# Altium PCB Membrane_Board_Latest.PcbDoc (part 4 of 4)
Units mil, origin at the board's own origin, x right, y up, seen from the top; angles counter-clockwise.
Board outline 11929.13 x 4962.8 mil, 2 copper layers (Top Layer, Bottom Layer), stack 59 mil thick; 247 components, 169 nets, 1256 pads, 657 vias.
Unrouted connection lines stored in the file: 293.
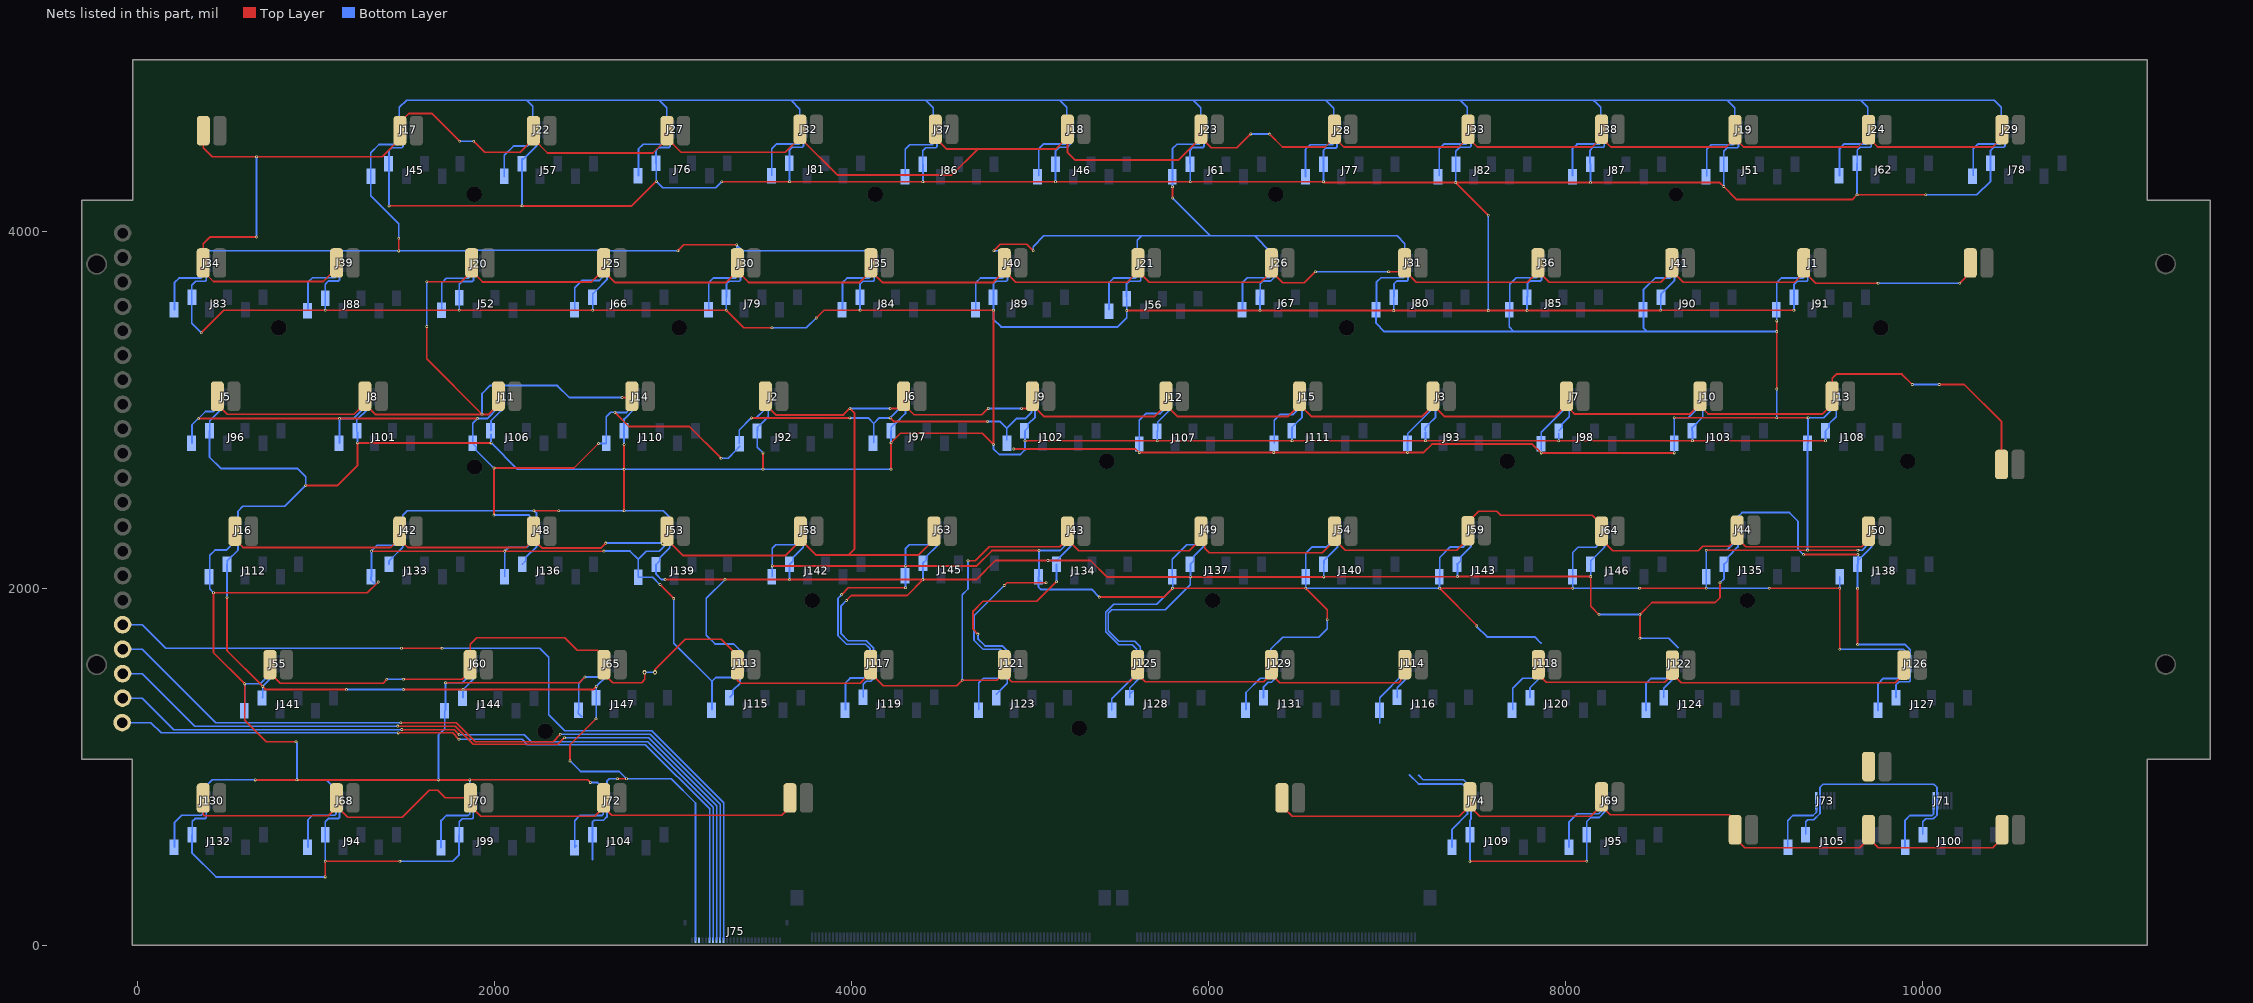
[diagram p4: the nets of this part, all layers, seen from the top]

## Via types
v1: diameter 15.75, hole 7.87, Top Layer to Bottom Layer, tented both sides, 655 vias
v2: diameter 23.62, hole 11.81, Top Layer to Bottom Layer, 2 vias

## Nets (pads, with @x,y where several pads share a name; then routed paths per layer and width w, separated by ;. In a path a pad name is that pad's centre, name@x,y a point inside that pad or via, vN(x,y) a via of type N, cw(c..) or ccw(c..) an arc to the next point about the centre after c; other vN are vias at no path point) (continued)
Row.ROW_1: J75.17 P17.1 SW1.1 SW2.1 SW3.1 SW4.1 SW5.1 SW6.1 SW7.1 SW8.1 SW41.1 SW42.1 SW43.1 SW44.1 SW45.1 SW46.1 SW47.1 SW48.1 | length 18103.5
  Top Layer w8: v1(1477.79,1663.46) v1(1705.79,1663.46)
  Top Layer w10: SW43.1@545,2320 545,2273.74 590.42,2228.32 1417.15,2228.32 1468.1,2279.28 SW44.1@1468.1,2320 ; SW44.1@1468.1,2273.74 1513.52,2228.32 2175.32,2228.32 SW45.1@2219.37,2272.37 ; SW45.1@2218,2320 2218,2273.74 SW45.1@2219.37,2272.37 ; SW45.1@2221,2274 SW45.1@2219.37,2272.37 ; v1(2621.97,2252.97) 2594,2225 2266.74,2225 SW45.1@2219.37,2272.37 ; v1(2942,2253) 2986.53,2253 3056.53,2183 3629,2183 3712.79,2266.79 SW47.1@3712.79,2273.74 ; SW1.1@3516.48,3076 3516.48,3029.74 3574.76,2971.46 3954.25,2971.46 v1(3990.79,3008) 4016,2982.79 4016,2219 3984,2187 ; SW47.1@3712.79,2320 SW47.1@3712.79,2273.74 ; v1(4216,3008) 4261.59,3008 SW2.1@4292,3038.41 ; SW2.1@4292,3076 SW2.1@4292,3038.41 ; SW48.1@4461.79,2320 4461.79,2272.79 4376,2187 3984,2187 ; v1@4766,3009 4729,2972 4349.74,2972 4292,3029.74 SW2.1@4292,3038.41 ; v1(4952,3008) 4982.07,3008 SW3.1@5012.48,3038.41 ; SW3.1@5012.48,3076 SW3.1@5012.48,3038.41 ; SW4.1@5760.79,3076 SW4.1@5760.79,3029.74 ; SW5.1@6509.1,3026.41 6444.69,2962 5828.53,2962 SW4.1@5760.79,3029.74 ; SW5.1@6509.79,3029.74 6577.53,2962 7193.69,2962 SW6.1@7258.1,3026.41 ; SW6.1@7256.79,3029.74 7324.53,2962 7940.69,2962 SW7.1@8005.1,3026.41 ; SW7.1@8005.79,3076 8005.79,3022.21 8006.17,3022.21 8033.72,2994.67 8033.72,2994.28 8052,2976 8695.9,2976 SW8.1@8747.82,3027.92 ; SW8.1@8731,3044.74 SW8.1@8747.82,3027.92 ; SW8.1@8760.31,3040.41 SW8.1@8747.82,3027.92 ; v1(9943,3142) 9885,3200 9518,3200 9494.48,3176.48 SW41.1@9494.48,3076 9494.48,3030.48 9441,2977 8798.74,2977 SW8.1@8747.82,3027.92 ; v1(10094.37,3142) 10234,3142 10443.48,2932.52 SW42.1@10443.48,2694 ; SW47.1@3712.79,2273.74 3799.53,2187 3984,2187 ; SW3.1@5012.48,3038.41 5012.48,3029.74 5080.22,2962 5696.38,2962 5760.79,3026.41 SW4.1@5760.79,3029.74
  Bottom Layer w8: P17.1@-84.75,1796.06 25.25,1796.06 157.85,1663.46 v1(1477.79,1663.46) ; v1(1705.79,1663.46) 2251.54,1663.46 2301.79,1613.21 2301.79,1292.46 2393.79,1200.46 2880.14,1200.46 3283.05,797.55 J75.17@3283.05,28.46
  Bottom Layer w10: v1(2621.97,2252.97) v1(2942,2253) ; v1(3990.79,3008) v1(4216,3008) ; v1(4766,3008) v1(4952,3008) ; v1(9943,3142) v1(10094.37,3142)
Row.ROW_2: J75.18 P18.1 SW9.1 SW10.1 SW11.1 SW12.1 SW13.1 SW14.1 SW15.1 SW16.1 SW49.1 SW50.1 SW51.1 SW52.1 SW53.1 SW54.1 SW55.1 SW56.1 | length 17595.9
  Top Layer w8: v1(1473.79,1246.46) 1785.54,1246.46 1891,1141 2327,1141 v1(2367.75,1181.75)
  Top Layer w10: SW53.1@447.31,3028.74 501.06,2975 1212,2975 1246.68,3009.68 SW54.1@1265.68,3009.68 ; SW54.1@1274.95,3030.99 1331.94,2974 1966.44,2974 SW55.1@2023.43,3030.99 ; v1(1619,3467) 1619,3285 v1(1929,2975) ; v1(1619,3717) 1811.74,3717 SW9.1@1871.48,3776.74 ; SW9.1@1871.48,3823 SW9.1@1871.48,3776.74 ; SW10.1@2611,3823 SW10.1@2611,3783.89 ; v1(2714,3069) 2761.48,3069 SW56.1@2768.48,3076 ; SW11.1@3359.48,3823 3359.48,3776.74 3296.74,3714 2673.74,3714 2611,3776.74 SW10.1@2611,3783.89 ; SW11.1@3359.69,3776.74 3422.43,3714 4045.43,3714 SW12.1@4108.17,3776.74 ; SW12.1@4108.69,3776.74 4171.43,3714 4794.43,3714 SW13.1@4857.17,3776.74 ; SW13.1@4857.43,3777.99 4920.17,3715.25 5543.17,3715.25 SW14.1@5605.91,3777.99 ; SW14.1@5605.95,3777.99 5668.69,3715.25 6291.69,3715.25 SW15.1@6352.59,3776.15 ; SW15.1@6352,3823 6352,3776.74 SW15.1@6352.59,3776.15 ; SW15.1@6354.43,3777.99 SW15.1@6352.59,3776.15 ; v1(6599,3774) 6537,3712 6416.74,3712 SW15.1@6352.59,3776.15 ; v1(7009,3774) 7068.07,3774 7098.48,3804.41 SW16.1@7098.48,3823 ; SW16.1@7100.43,3777.99 7163.17,3715.25 7786.17,3715.25 SW49.1@7848.17,3777.25 ; SW49.1@7847.43,3777.99 SW49.1@7848.17,3777.25 ; SW49.1@7848.91,3777.99 SW49.1@7848.17,3777.25 ; SW50.1@8595.91,3777.99 8533.17,3715.25 7910.17,3715.25 SW49.1@7848.17,3777.25 ; SW50.1@8597.43,3777.99 8660.17,3715.25 9283.17,3715.25 SW51.1@9339.83,3771.91 ; SW51.1@9335,3823 9335,3776.74 SW51.1@9339.83,3771.91 ; v1(9752,3709) 9402.74,3709 SW51.1@9339.83,3771.91 ; v1(10209,3709) 10240.92,3740.92 10240.92,3742.03 10268.48,3769.59 SW52.1@10268.48,3823 ; SW9.1@1871.48,3776.74 1932.22,3716 2542,3716 2575.18,3749.18 2576.29,3749.18 SW10.1@2611,3783.89
  Bottom Layer w8: P18.1@-84.75,1658.91 25.25,1658.91 437.7,1246.46 v1(1473.79,1246.46) v1@1474.11,1246.46 ; v1(2367.75,1181.75) 2871.02,1181.75 3263.36,789.4 J75.18@3263.36,28.46
  Bottom Layer w10: v1(1619,3467) v1(1619,3717) ; v1(1929,2975) 1929,3091 1973.46,3135.46 2351.54,3135.46 2418,3069 v1(2714,3069) ; v1(6599,3774) v1(7009,3774) ; v1(9752,3709) v1(10209,3709)
Row.ROW_3: J75.19 P19.1 SW17.1 SW18.1 SW19.1 SW20.1 SW21.1 SW22.1 SW23.1 SW24.1 SW57.1 SW58.1 SW59.1 SW60.1 SW61.1 SW62.1 SW63.1 SW64.1 | length 18513.9
  Top Layer w8: SW24.1@741,1572 741,1525.74 797.74,1469 1374.79,1469 v1(1395.79,1490) ; v1(1456.79,1227.46) 1779.92,1227.46 1881.38,1126 2353.92,1126 v1(2390.79,1162.87) ; v1@1489,1490 1819.6,1490 1863,1533.4 SW57.1@1863,1572 1863,1685 1901,1723 2394,1723 2463,1654 2574.71,1654 2611.48,1617.23 SW58.1@2611.48,1572 2611.48,1521.64 2661.12,1472 2823,1472 2840,1489 v2(2840,1529) ; v2(2898,1529) 2898,1544 3068,1714 3269,1714 3359.48,1623.52 SW59.1@3359.48,1572 3360,1571.48 3360,1486 3378,1468 4048,1468 SW60.1@4107,1527 ; SW60.1@4107,1572 SW60.1@4107,1527 ; v1(4652.05,2154.46) 4692.46,2154.46 4770,2232 5166.65,2232 5208.39,2273.74 SW17.1@5209.42,2273.74 ; SW61.1@4834,1502 4831.74,1502 4814.2,1484.46 v1(4620.05,1484.46) 4588.59,1453 4177,1453 4107,1523 SW60.1@4107,1527 ; SW61.1@4855.48,1572 4855.48,1518.52 4897,1477 5559,1477 SW62.1@5603,1521 ; SW17.1@5209.42,2320 SW17.1@5209.42,2273.74 ; SW62.1@5603,1572 SW62.1@5603,1521 ; SW63.1@6351.48,1572 SW63.1@6351.48,1519.52 ; SW19.1@6706,2320 SW19.1@6706,2273.74 ; SW64.1@7099.48,1572 7075.83,1548.35 7075.83,1480.83 7067,1472 6399,1472 SW63.1@6351.48,1519.52 ; SW22.1@8962.48,2326 SW22.1@8962.48,2279.74 ; SW23.1@9698.48,2320 9698.48,2271.48 9659.33,2232.33 9009.89,2232.33 SW22.1@8962.48,2279.74 ; SW17.1@5209.42,2273.74 5274.16,2209 5892,2209 5958,2275 SW18.1@5958,2320 5978.68,2299.32 5978.68,2225.32 6003.87,2200.13 6637.13,2200.13 6706,2269 SW19.1@6706,2273.74 ; SW62.1@5603,1521 5603,1518.05 5644.05,1477 6310.43,1477 6351.48,1518.05 SW63.1@6351.48,1519.52 ; SW19.1@6706,2273.74 6765.74,2214 7391,2214 7453.48,2276.48 SW20.1@7453.48,2323 7453.48,2369.26 7515.22,2431 7616,2431 7638,2409 8150.71,2409 8202.05,2357.66 SW21.1@8202.05,2320 8202.05,2273.74 8264.79,2211 8745,2211 8770,2236 8918.74,2236 SW22.1@8962.48,2279.74
  Bottom Layer w8: P19.1@-84.75,1521.76 25.25,1521.76 319.55,1227.46 v1(1456.79,1227.46) ; v1@1396,1490 v1(1488.79,1490) ; v1(2390.79,1162.87) 2862.05,1162.87 3243.68,781.25 J75.19@3243.68,28.46 ; v2(2840,1529) v2(2898,1529) ; v1@4619,1484 4620,1485 4620,1811
  Bottom Layer w10: 4620,1811 4620,1964 4652.05,1996.05 v1(4652.05,2154.46)
Row.ROW_4: J75.20 P20.1 SW25.1 SW26.1 SW27.1 SW28.1 SW29.1 SW30.1 SW31.1 SW32.1 SW65.1 SW66.1 SW67.1 SW68.1 SW69.1 SW70.1 SW71.1 | length 14941.7
  Top Layer w8: SW28.1@367,825 367,733 374,726 1068.43,726 1113.48,771.05 SW29.1@1113.48,778.74 ; SW29.1@1113.48,825 SW29.1@1113.48,778.74 ; v1(1479.79,1208.46) 1772.23,1208.46 v1(1800.85,1179.85) ; SW30.1@1863,872 SW30.1@1863.48,871.52 ; SW31.1@2610.48,825 SW31.1@2610.48,773.52 ; SW32.1@3654.48,825 3654.48,773.48 3609,728 2656,728 SW31.1@2610.48,773.52 ; SW65.1@6411.48,825 6411.48,774.48 6411,774 6416.22,774 6468.22,722 7404,722 SW66.1@7464,782 ; SW66.1@7464,831 SW66.1@7464,782 ; SW25.1@7847.48,1571 7847.48,1517.52 7892,1473 8554.97,1473 SW26.1@8598,1516.03 ; SW67.1@8202,831 SW67.1@8202,784 ; SW26.1@8598.48,1520.52 8649,1470 9848,1470 9896,1518 SW27.1@9896,1570 ; SW70.1@9698,647 SW70.1@9698,600.74 ; SW71.1@10446,647 10446,597 10394,545 9753.74,545 SW70.1@9698,600.74 ; SW29.1@1113.48,778.74 1176.22,716 1483,716 1634,867 1681,867 1723,825 SW30.1@1863.48,825 1863.48,780.48 1863,780 1921,722 2561,722 2610.48,771.48 SW31.1@2610.48,773.52 ; SW66.1@7464,782 7464,779 7519,724 8142,724 SW67.1@8202,784 ; SW67.1@8202,784 8202,780 8252,730 8919,730 8950,699 SW68.1@8950,647 8950,602 8948,600 8950.74,600 9005.74,545 9649.95,545 9698,593.05 SW70.1@9698,600.74
  Bottom Layer w8: P20.1@-84.75,1384.61 25.25,1384.61 201.4,1208.46 v1(1479.79,1208.46) ; v1(1800.85,1179.85) 1801.69,1179 2167,1179 2206,1140 2857.09,1140 3223.99,773.09 J75.20@3223.99,28.46
Row.ROW_5: J75.21 P21.1 SW33.1 SW34.1 SW35.1 SW36.1 SW37.1 SW38.1 SW39.1 SW40.1 SW73.1 SW74.1 SW75.1 SW76.1 SW77.1 SW78.1 SW79.1 SW80.1 | length 17969.6
  Top Layer w8: v1(1459.79,1189.46) 1764.54,1189.46 v1(1800,1154)
  Top Layer w10: SW33.1@367.48,4564 367.48,4467.52 417,4418 v1(666,4418) 1369.74,4418 1469.48,4517.74 SW34.1@1469.48,4564 1469.48,4610.26 1520.22,4661 1648,4661 v1(1804,4505) ; v1(666,3968) 404,3968 367,3931 SW79.1@367,3823 367,3776.74 424.74,3719 1039.54,3719 1114.48,3793.94 SW80.1@1114.48,3823 ; v1(1882.5,4505) 1944.5,4443 2142.74,4443 SW35.1@2217.48,4517.74 ; SW35.1@2217.48,4564 SW35.1@2217.48,4517.74 ; SW36.1@2966,4564 SW36.1@2966,4521 ; SW37.1@3710.79,4571.75 SW37.1@3710.79,4525.49 ; SW38.1@4469,4571.75 4469,4525.49 4533.49,4461 4706,4461 ; SW40.1@5957,4571.75 SW40.1@5957,4525.49 ; v1(6237,4546) 6159,4468 6014.49,4468 SW40.1@5957,4525.49 ; v1(6342,4545) 6414.25,4472.75 6652.74,4472.75 SW73.1@6705.48,4525.49 ; SW73.1@6705.48,4571.75 SW73.1@6705.48,4525.49 ; SW74.1@7454,4571.75 SW74.1@7454,4525.49 ; SW75.1@8202.48,4571.75 SW75.1@8202.48,4525.49 ; SW76.1@8950.48,4569.75 8950.48,4523.49 SW76.1@8948.91,4521.92 ; SW77.1@9694.1,4527.84 9639.01,4472.75 8998.07,4472.75 SW76.1@8948.91,4521.92 ; SW77.1@9698,4569.75 9698,4523.49 9748.74,4472.75 10393.1,4472.75 SW78.1@10446.48,4526.13 ; SW35.1@2217.48,4517.74 2296.22,4439 2887.26,4439 2961.26,4513 2966,4513 SW36.1@2966,4521 ; SW36.1@2966,4521 3044,4443 3628.3,4443 SW37.1@3710.79,4525.49 ; SW37.1@3710.79,4525.49 3921.28,4315 4560,4315 4706,4461 ; 4706,4461 5144.51,4461 5184.51,4501 5209,4501 5209,4444 5254,4399 5830.51,4399 SW40.1@5957,4525.49 ; SW73.1@6705.48,4525.49 6758.22,4472.75 7401.26,4472.75 SW74.1@7454,4525.49 ; SW74.1@7454,4525.49 7506.74,4472.75 8149.74,4472.75 SW75.1@8202.48,4525.49 ; SW75.1@8202.48,4525.49 8202.48,4523.66 8253.39,4472.75 8899.74,4472.75 SW76.1@8948.91,4521.92
  Top Layer w12: SW78.1@10446.48,4526.13 SW78.1@10446.48,4569.75
  Bottom Layer w8: P21.1@-87.27,1247.46 73.54,1247.46 131.25,1189.75 821.21,1189.75 821.5,1189.46 v1(1459.79,1189.46) ; v1(1800,1154) 2154,1154 2184,1124 2843.81,1124 3204.31,763.5 J75.21@3204.31,28.46
  Bottom Layer w10: v1(666,3968) v1(666,4418) ; v1(1804,4505) v1(1882.5,4505) ; v1(6237,4546) 6237.5,4545.5 6341.5,4545.5 v1(6342,4545)
VCC_3V3: J1.2 J2.2 J3.2 J5.2 J6.2 J7.2 J8.2 J9.2 J10.2 J11.2 J12.2 J13.2 J14.2 J15.2 J16.2 J17.2 J18.2 J19.2 J20.2 J21.2 J22.2 J23.2 J24.2 J25.2 J26.2 J27.2 J28.2 J29.2 J30.2 J31.2 J32.2 J33.2 J34.2 J35.2 J36.2 J37.2 J38.2 J39.2 J40.2 J41.2 J42.2 J43.2 J44.2 J45.2 J46.2 J48.2 J49.2 J50.2 J51.2 J52.2 J53.2 J54.2 J55.2 J56.2 J57.2 J58.2 J59.2 J60.2 J61.2 J62.2 J63.2 J64.2 J65.2 J66.2 J67.2 J68.2 J69.2 J70.2 J71.2 J72.2 J73.2 J74.2 J75.25 J76.2 J77.2 J78.2 J79.2 J80.2 J81.2 J82.2 J83.2 J84.2 J85.2 J86.2 J87.2 J88.2 J89.2 J90.2 J91.2 J92.2 J93.2 J94.2 J95.2 J96.2 J97.2 J98.2 J99.2 J100.2 J101.2 J102.2 J103.2 J104.2 J105.2 J106.2 J107.2 J108.2 J109.2 J110.2 J111.2 J112.2 J113.2 J114.2 J115.2 J116.2 J117.2 J118.2 J119.2 J120.2 J121.2 J122.2 J123.2 J124.2 J125.2 J126.2 J127.2 J128.2 J129.2 J130.2 J131.2 J132.2 J133.2 J134.2 J135.2 J136.2 J137.2 J138.2 J139.2 J140.2 J141.2 J142.2 J143.2 J144.2 J145.2 J146.2 J147.2 | length 74949.2
  Top Layer w10: v1(355.79,3431.46) 482.16,3557.83 v1(1050.84,3557.83) v1(1801.84,3557.83) v1(2550.1,3557.83) v1(3298.1,3557.83) 3396.47,3459.46 v1(3553.79,3459.46) ; v1(500.42,1948.83) 500.42,1649.81 v1@699.77,1450.46 ; v1(700.16,1450.07) 717.77,1432.46 1168.46,1432.46 v1@1169,1433 ; v1(940.79,2576.58) 1119.92,2576.58 1231.79,2688.46 v1(1231.79,2814.46) v1(1980.16,2814.46) ; v1(1050.96,383) v1(1050.96,470) v1(1468.96,470) ; v1(1407.79,4142.46) 1408.5,4143.17 2153.08,4143.17 v1(2153.79,4143.87) ; v1(1488.79,1432.46) 2551.73,1432.46 v1(2569.73,1450.46) ; v1@2153.79,4142.46 2768.46,4142.46 v1(2906,4280) ; v1(2219.79,2434.46) v1(2358.81,2434.46) ; v1(2422,1033) 2422,1122.78 v1(2567.79,1268.57) ; v1@2689.79,932.46 v1(2738.79,932.46) ; v1(2725.1,2434.46) v1(2725.1,2805.46) ; v1(2954.79,2048.54) v1(3290.79,2048.54) v1(3652.79,2048.54) v1(4399.79,2048.54) ; v1@3273.23,4278 v1(3652.48,4278) v1(4399.68,4278) v1(5142.36,4278) ; v1(3503.79,2666.87) v1(3503.79,2758.46) ; v1(3801.79,3514.46) 3845.16,3557.83 v1(4047.79,3557.83) v1(4794.79,3557.83) v1(4794.79,2806.46) 4732.79,2868.46 4274.16,2868.46 4220.97,2815.27 4220.97,2667.06 v1(4220.79,2666.87) ; v1(3970.79,1931.46) 3998.79,1959.46 4310.71,1959.46 v1(4399.79,2048.54) ; v1(4708,1743) 4681,1770 4681,1872 4736.46,1927.46 5037.79,1927.46 v1(5147.42,2037.09) ; v1(4971.79,2826.46) v1(5713.16,2826.46) v1(6468.16,2826.46) v1(7216.16,2826.46) v1(7961.79,2826.46) v1(8711.16,2826.46) v1(9456.79,2826.46) ; 5150.36,4278 v1(5897.05,4278) v1(6643.73,4278) ; v1(5541.84,3555.69) v1(6288.16,3555.69) v1@7037.42,3555.69 ; v1@6643.73,4273 v1@7385.42,4273 ; v1@6645.42,2063.83 5430.42,2063.83 5338.79,2155.46 v1(5099.79,2155.46) 4805.46,2155.46 4698.54,2048.54 v1(4399.79,2048.54) ; v1(6645.79,2063.46) 6646.82,2064.49 7393.65,2064.49 v1(7394.68,2065.51) v1@8141.68,2065.51 ; v1(7037.84,3555.69) v1(7567.79,3555.69) v1(7785.16,3555.69) v1@8533.16,3555.69 ; v1@7464.47,470.13 v1@8119.42,470.13 ; v1@7567.79,4090.63 v1(7385.42,4273) ; v1(8142.05,2065.14) 8142.05,1898.2 v1(8187.79,1852.46) ; v1@8416.79,1720.46 v1@8416.79,1846.46 ; v1(8416.79,1852.46) 8484.79,1920.46 8838.79,1920.46 8865.79,1947.46 v1(8865.79,2030.46) ; v1(8534.16,3557.48) v1(9279.79,3557.46) ; v1(9333.79,2188.75) v1(9638.42,2188.75) ; v1(9636.79,1684.46) v1(9636.79,2000.46) ; v1@10017,4204.58 v1(9633.47,4204.58) 9606.89,4178 8959.8,4178 v1(8886.79,4251.01) 8864.8,4273 v1(8140.1,4273) v1(7385.42,4273)
  Bottom Layer w8: 5618.42,1655 5618.42,1672.58 5586.54,1704.46 5497.79,1704.46 5439,1763.25 5439,1858.79 5458.67,1878.46 5757.79,1878.46 5898.42,2019.09 v1(5898.42,2063.83)
  Bottom Layer w10: J132.2@303.79,619.25 303.79,518 438.79,383 v1(1050.96,383) ; J132.2@305.42,620.88 305.42,693.75 321.42,709.75 378.25,709.75 384.1,715.61 J130.2@384.1,810.75 ; v1(355.79,3431.46) 303.1,3484.14 J83.2@303.1,3630.25 303.1,3698.77 325.08,3720.75 377.56,3720.75 383.42,3726.61 J34.2@383.42,3821.75 ; J96.2@401.73,2882.25 401.73,2735.51 465.79,2671.46 894.79,2671.46 940.95,2625.3 v1@940.95,2576.42 ; J96.2@403.36,2883.88 403.36,2939.36 465.05,3001.05 J5.2@465.05,3073.75 ; v1(500.42,1948.83) J112.2@500.42,2134.25 ; J112.2@502.05,2135.88 502.05,2154.18 561.73,2213.87 J16.2@561.73,2325.75 561.73,2431.73 589.46,2459.46 823.66,2459.46 v1(940.79,2576.58) ; J141.2@698.73,1386.88 700.16,1388.31 v1(700.16,1450.07) 757,1506.9 J55.2@757,1577.86 ; v1@1049.96,470 1050.73,470.77 J94.2@1050.73,619.25 1050.73,692.12 1068.36,709.75 1125.19,709.75 1131.05,715.61 J68.2@1131.05,810.75 ; v1@1050.79,3557.88 J88.2@1050.79,3625.62 1050.79,3704.18 1068.36,3721.75 1125.19,3721.75 1131.05,3727.61 J39.2@1131.05,3822.75 ; v1@1170.27,1432.46 v1@1488.62,1432.46 ; J101.2@1227.79,2882.25 1227.79,2943.79 1288.1,3004.1 J8.2@1288.1,3073.75 ; J101.2@1228.79,2877.46 1231.79,2874.46 v1(1231.79,2814.46) ; v1(1407.79,4142.46) 1407.79,4452.75 1423.79,4468.75 1480.62,4468.75 1486.47,4474.61 J17.2@1486.47,4569.75 ; J133.2@1408.73,2135.88 1408.73,2154.18 1427.1,2172.55 1427.55,2172.55 1485.42,2230.42 1485.42,2410.09 1509.79,2434.46 v1(2219.79,2434.46) 2234.73,2419.51 J48.2@2234.73,2325.75 2234.73,2233.73 2174.42,2173.42 2174.42,2154.25 J136.2@2156.05,2135.88 ; v1(1468.96,470) 1766,470 1799.79,503.79 J99.2@1799.79,618.25 ; J99.2@1801.42,619.88 1801.42,692.75 1817.42,708.75 1874.25,708.75 1880.1,714.61 J70.2@1880.1,809.75 ; v1(1801.84,3557.83) J52.2@1801.84,3628.56 ; J52.2@1802.05,3629.88 1802.05,3702.75 1818.05,3718.75 1874.88,3718.75 1880.73,3724.61 J20.2@1880.73,3819.75 ; J144.2@1822.42,1386.88 1822.42,1432.46 1879.1,1489.14 J60.2@1879.1,1576.75 ; J106.2@1979.05,2883.88 1979.05,2937.05 2035.73,2993.73 J11.2@2035.73,3073.75 ; J106.2@1980.1,2862.19 1980.1,2814.46 2127.69,2666.87 v1@2724.69,2666.87 ; v1(2153.79,4143.87) 2153.79,4405.94 2163.13,4405.94 2234.05,4476.87 J22.2@2234.05,4569.75 ; v1(2358.81,2434.46) 2945.54,2434.46 2981.1,2398.9 2981.1,2228.1 2924.79,2171.79 2924.79,2153.25 J139.2@2904.79,2133.25 2904.79,2078.46 2934.71,2048.54 v1(2954.79,2048.54) ; v1(2422,1033) 2481.54,973.46 2697.79,973.46 v1(2738.79,932.46) 2989.75,932.46 3125.57,796.64 J75.25@3125.57,28.46 ; 2548.42,479.46 J104.2@2548.42,618.25 2548.42,691.12 2557.3,700 2610,700 2628.73,718.73 J72.2@2628.73,809.75 2628.73,918.4 2642.79,932.46 v1(2687.79,932.46) ; v1(2550.1,3557.83) 2550.05,3650.18 2568.42,3668.55 2568.55,3668.55 2628.73,3728.73 J25.2@2628.73,3821.75 ; v1(2567.79,1268.57) 2568.73,1269.51 J147.2@2568.73,1386.25 2569.73,1387.25 v1(2569.73,1450.46) 2627.05,1507.77 J65.2@2627.05,1577.75 ; v1(2725.1,2805.46) J110.2@2725.1,2882.25 2725.1,2947.97 2786.42,3009.29 J14.2@2786.42,3073.75 ; v1@2725.52,2666.87 v1@3507.79,2666.87 ; J76.2@2903.16,4382.32 2906,4379.48 v1(2906,4280) 2941.35,4244.65 3238.63,4244.65 v1(3271.98,4278) ; J76.2@2904.79,4380.88 2904.79,4453.75 2920.79,4469.75 2977.62,4469.75 2983.47,4475.61 J27.2@2983.47,4570.75 ; v1(3290.79,2048.54) 3186,1943.75 3186,1737 3235,1688 3339,1688 3375.42,1651.58 J113.2@3375.42,1578.75 3375.42,1468.42 3335.1,1428.1 3335.1,1407.25 J115.2@3316.73,1388.88 ; v1(3298.1,3557.83) J79.2@3298.1,3634.32 ; J79.2@3298.73,3631.88 3298.73,3704.75 3314.73,3720.75 3371.56,3720.75 3377.42,3726.61 J30.2@3377.42,3821.75 ; J92.2@3471.1,2881.25 3471.1,2791.14 v1(3503.79,2758.46) ; J92.2@3472.73,2882.88 3472.73,2901.18 3491.1,2919.55 3533,2961.45 J2.2@3533,3070.23 ; v1@3508.2,2666.87 v1(4220.79,2666.87) ; v1(3553.79,3459.46) 3746.79,3459.46 v1(3801.79,3514.46) ; J81.2@3650.73,4382.32 3652.48,4380.58 v1(3652.48,4278) ; J81.2@3651.79,4381.88 3651.79,4454.75 3667.79,4470.75 3724.62,4470.75 3730.47,4476.61 J32.2@3730.47,4571.75 ; v1(3652.79,2048.54) J142.2@3652.79,2134.25 3672.79,2154.25 3672.79,2174.29 3723.25,2224.75 3729.1,2230.61 J58.2@3729.1,2325.75 ; v1(3970.79,1931.46) 3941,1901.67 3941,1745.25 3979.79,1706.46 4082,1706.46 4123.42,1665.04 J117.2@4123.42,1579.75 J117.2@4123.42,1570.58 ; v1@4047.73,3557.83 4047.73,3704.75 4063.73,3720.75 4120.56,3720.75 4126.42,3726.61 J35.2@4126.42,3821.75 ; J119.2@4064.73,1389.88 4064.73,1462.75 4080.98,1479 4107,1479 4123.42,1495.42 J117.2@4123.42,1570.58 ; J117.2@4124,1570 J117.2@4123.42,1570.58 ; v1@4221.1,2813.46 J97.2@4221.1,2881.19 ; J97.2@4222.73,2884.88 4222.73,2903.18 4241.1,2921.55 4243.55,2921.55 4301.42,2979.42 J6.2@4301.42,3074.75 ; J86.2@4398.79,4376.62 4398.79,4450.75 4415.79,4467.75 4472.62,4467.75 4478.47,4473.61 J37.2@4478.47,4568.75 ; v1(4399.68,4278) J86.2@4399.68,4376.61 ; v1(4399.79,2048.54) J145.2@4399.79,2140.32 4419.79,2160.32 4419.79,2178.79 4480.42,2239.42 J63.2@4480.42,2326.75 ; v1(4708,1743) 4708,1716.25 4747.79,1676.46 4828,1676.46 ; v1(4794.79,2806.46) 4794.79,2781.46 4826.79,2749.46 4945.79,2749.46 4971.79,2775.46 4971.79,2806.46 ; J89.2@4794.79,3634.32 v1(4794.79,3557.83) 4794.79,3507.46 4837.79,3464.46 5490.79,3464.46 5541.84,3515.51 v1(5541.84,3555.69) ; J89.2@4795.1,3631.88 4795.1,3704.75 4811.1,3720.75 4867.93,3720.75 4873.79,3726.61 J40.2@4873.79,3821.75 ; J123.2@4812.05,1407.05 4812.05,1407.18 4830.42,1425.55 4830.55,1425.55 4871.73,1466.73 J121.2@4871.73,1578.75 4871.73,1650.27 4846,1676 4828,1676 ; 4971.42,2806.46 4971.79,2806.83 4971.79,2881.88 4971.42,2882.25 4989.79,2900.62 4989.79,2920.79 5028.1,2959.1 J9.2@5028.1,3073.75 ; v1(5099.79,2155.46) 5150.32,2155.46 5167.42,2172.55 5167.42,2174.83 5227.73,2235.14 J43.2@5227.73,2325.75 ; J46.2@5141.79,4376.62 5141.79,4448.81 5163.73,4470.75 5207.75,4470.75 5226.42,4489.42 J18.2@5226.42,4571.75 ; v1(5142.36,4278) J46.2@5142.36,4376.04 ; v1(5147.42,2037.09) J134.2@5147.42,2134.25 ; J56.2@5541.05,3631.88 5541.05,3704.75 5557.05,3720.75 5613.88,3720.75 5619.73,3726.61 J21.2@5619.73,3821.75 ; v1@5541.79,3555.75 J56.2@5541.79,3623.32 ; J128.2@5558.1,1387.25 5558.1,1441.1 5618.42,1501.42 J125.2@5618.42,1554.42 ; J128.2@5559.73,1406.73 5559.73,1407.18 J128.2@5578.1,1425.55 ; J125.2@5618.42,1578.75 5618.42,1655 ; J107.2@5711.79,2879.25 5713.16,2877.88 v1(5713.16,2826.46) ; J107.2@5713.42,2880.88 5715.7,2883.15 5715.7,2931.7 5777.1,2993.1 J12.2@5777.1,3070.75 ; J61.2@5896.42,4380.88 5896.42,4453.75 5912.42,4469.75 5969.25,4469.75 5975.1,4475.61 J23.2@5975.1,4570.75 ; v1(5897.05,4278) J61.2@5897.05,4376.61 ; v1(5898.42,2063.83) 5898.42,2135.25 5916.79,2153.62 5916.79,2178.57 5974.1,2235.88 J49.2@5974.1,2326.75 ; v1@6288.1,3555.69 J67.2@6288.1,3631.4 ; J67.2@6289.73,3632.88 6289.73,3705.75 6305.73,3721.75 6348.75,3721.75 6368.42,3741.42 J26.2@6368.42,3822.75 ; J131.2@6307.42,1387.25 6307.42,1446.42 6334,1473 6353,1473 6368.73,1488.73 J129.2@6368.73,1578.75 ; J111.2@6466.1,2882.25 6468.16,2880.19 v1(6468.16,2826.46) ; J111.2@6467.73,2883.88 6467.73,2902.18 6486.1,2920.55 6486.55,2920.55 6524.42,2958.42 J15.2@6524.42,3073.75 ; v1(6643.73,4278) J77.2@6643.73,4376.62 ; J77.2@6643.79,4376.62 6643.79,4452.75 6657.79,4466.75 6714.62,4466.75 6720.47,4472.61 J28.2@6720.47,4567.75 ; v1(6645.79,2063.46) J140.2@6645.79,2134.19 ; J140.2@6646.36,2136.88 6646.36,2155.18 6722.05,2230.87 J54.2@6722.05,2326.75 ; v1@7037.79,3555.69 J80.2@7037.79,3631.4 ; J80.2@7039.42,3632.88 7039.42,3705.75 7055.42,3721.75 7112.25,3721.75 7118.1,3727.61 J31.2@7118.1,3822.75 ; J116.2@7057.1,1388.25 7057.1,1442.9 7115.42,1501.21 J114.2@7115.42,1579.75 ; 7176.79,952.46 7201.79,927.46 7428.79,927.46 7470.79,885.46 J74.2@7470.79,810.75 7471,810.54 7471,707 7464.47,700.47 v1@7464.47,470.13 ; J93.2@7214.16,2882.25 7214.16,2900.55 7234.16,2920.55 7234.55,2920.55 7272.47,2958.47 J3.2@7272.47,3073.75 ; v1@7216.1,2826.46 J93.2@7216.1,2872.19 ; v1(7385.42,4273) J82.2@7385.42,4376.62 ; J82.2@7385.79,4376.62 7385.79,4448.75 7407.79,4470.75 7464.62,4470.75 7470.47,4476.61 J33.2@7470.47,4571.75 ; J143.2@7392.73,2135.25 7412.73,2155.25 7412.73,2175.73 7470.05,2233.05 J59.2@7470.05,2326.75 ; v1(7394.68,2065.51) J143.2@7394.68,2135.25 ; v1(7567.79,3555.69) v1(7567.79,4090.46) ; v1@7785.1,3555.69 J85.2@7785.1,3634.19 ; J85.2@7786.73,3632.88 7786.73,3705.75 7802.73,3721.75 7859.56,3721.75 7865.42,3727.61 J36.2@7865.42,3822.75 ; J120.2@7801.47,1387.25 7801.47,1442.47 7863,1504 J118.2@7863,1580.4 ; v1(7961.79,2826.46) J98.2@7961.79,2867.93 ; J98.2@7963.79,2882.88 7982.16,2901.25 7982.16,2921.16 8021,2960 J7.2@8021,3077.96 ; v1(8119.42,470.67) 8119.42,693.09 8141.79,715.46 8188.79,715.46 8220.73,747.4 J69.2@8220.73,809.75 ; J87.2@8138.05,4381.88 8138.05,4454.75 8154.05,4470.75 8210.88,4470.75 8216.73,4476.61 J38.2@8216.73,4571.75 ; v1(8140.1,4273) J87.2@8140.1,4376.62 ; v1(8142.05,2065.14) 8142.05,2154.18 8160.42,2172.55 8161.55,2172.55 8218.73,2229.73 J64.2@8218.73,2325.75 ; v1(8187.79,1852.46) v1(8416.79,1852.46) ; v1@8417.79,1719.46 8578.79,1719.46 8631.1,1667.14 ; v1@8534.1,3557.48 J90.2@8534.1,3633.19 ; J90.2@8535.73,3631.88 8535.73,3650.18 8611.42,3725.87 J41.2@8611.42,3821.75 ; J124.2@8550.79,1386.25 8550.79,1440.79 8569.79,1459.79 8570.79,1459.79 8610.1,1499.1 J122.2@8610.1,1577.75 ; J103.2@8709.47,2882.25 8709.47,2900.55 8768.79,2959.87 J10.2@8768.79,3073.75 ; v1@8711.1,2826.46 J103.2@8711.1,2882.19 ; v1(8865.79,2030.46) 8888.73,2053.4 J135.2@8888.73,2135.25 8908.73,2155.25 8908.73,2174.73 8966.05,2232.05 J44.2@8966.05,2326.75 8966.05,2400.72 8989.79,2424.46 9254.54,2424.46 9303,2376 9303,2219.54 v1(9333.79,2188.75) ; v1(8886.79,4251.01) J51.2@8886.79,4376.62 8886.79,4448.12 8906.42,4467.75 8963.25,4467.75 8969.1,4473.61 J19.2@8969.1,4568.75 ; v1(9279.79,3557.46) 9279.79,3628.93 J91.2@9281.1,3630.25 9281.1,3703.12 9298.73,3720.75 9351.56,3720.75 9357.42,3726.61 J1.2@9357.42,3821.75 ; J105.2@9345.79,621.32 9345.79,691.12 9357.13,702.46 9390.79,702.46 9426.1,737.77 J73.2@9426.1,809.75 9426.1,885.1 9443,902 10064,902 10082.47,883.53 J71.2@10082.47,809.75 ; v1(9456.79,2826.46) J108.2@9456.79,2877.93 ; J108.2@9458.42,2883.88 9476.79,2902.25 9476.79,2920.79 9517.1,2961.1 J13.2@9517.1,3073.75 ; v1(9633.47,4204.58) J62.2@9633.47,4381.25 ; J62.2@9635.1,4382.88 9635.1,4455.75 9651.1,4471.75 9707.93,4471.75 9713.79,4477.61 J24.2@9713.79,4572.75 ; v1(9636.79,1684.46) 9903.79,1684.46 9932.05,1656.2 J126.2@9932.05,1577.75 9932.05,1482.61 9926.19,1476.75 9869.36,1476.75 9851.73,1459.12 J127.2@9851.73,1386.25 ; v1(9636.79,2000.46) J138.2@9636.79,2134.25 ; J138.2@9638.42,2135.88 v1(9638.42,2188.75) ; J138.2@9639.03,2154.79 9656.79,2172.55 9656.79,2174.79 9715.21,2233.21 9715.21,2323.86 J50.2@9717.1,2325.75 ; J100.2@10001.79,621.69 10001.79,691.49 10019.42,709.12 10061.45,709.12 10082.1,729.77 J71.2@10082.1,809.75 ; v1(10019,4204.58) 10305.58,4204.58 10381.79,4280.79 J78.2@10381.79,4380.25 10381.79,4453.12 10399.42,4470.75 10456.25,4470.75 10462.1,4476.61 J29.2@10462.1,4571.75
  other v1: 7464.47,469.58 1170.1,1432.46 1822.79,1432.46 8416.79,1719.46 2725.1,2666.87 4221.16,2815.46
VDD: J1.1 J2.1 J3.1 J5.1 J6.1 J7.1 J8.1 J9.1 J10.1 J11.1 J12.1 J13.1 J14.1 J15.1 J16.1 J17.1 J18.1 J19.1 J20.1 J21.1 J22.1 J23.1 J24.1 J25.1 J26.1 J27.1 J28.1 J29.1 J30.1 J31.1 J32.1 J33.1 J34.1 J35.1 J36.1 J37.1 J38.1 J39.1 J40.1 J41.1 J42.1 J43.1 J44.1 J45.1 J46.1 J48.1 J49.1 J50.1 J51.1 J52.1 J53.1 J54.1 J55.1 J56.1 J57.1 J58.1 J59.1 J60.1 J61.1 J62.1 J63.1 J64.1 J65.1 J66.1 J67.1 J68.1 J69.1 J70.1 J71.1 J72.1 J73.1 J74.1 J75.24 J76.1 J77.1 J78.1 J79.1 J80.1 J81.1 J82.1 J83.1 J84.1 J85.1 J86.1 J87.1 J88.1 J89.1 J90.1 J91.1 J92.1 J93.1 J94.1 J95.1 J96.1 J97.1 J98.1 J99.1 J100.1 J101.1 J102.1 J103.1 J104.1 J105.1 J106.1 J107.1 J108.1 J109.1 J110.1 J111.1 J112.1 J113.1 J114.1 J115.1 J116.1 J117.1 J118.1 J119.1 J120.1 J121.1 J122.1 J123.1 J124.1 J125.1 J126.1 J127.1 J128.1 J129.1 J130.1 J131.1 J132.1 J133.1 J134.1 J135.1 J136.1 J137.1 J138.1 J139.1 J140.1 J141.1 J142.1 J143.1 J144.1 J145.1 J146.1 J147.1 | length 81619.6
  Top Layer w8: v1(3026.73,3891.46) 3059.28,3924 v1(3357,3924) ; v1(4797.58,3891.73) 4833.84,3928 4981.25,3928 v1(5017.79,3891.46)
  Top Layer w10: v1(340.08,2951) v1(1130.42,2951) v1(1903.28,2951) ; v1@656.79,926.46 v1(1860.42,926.46) ; v1(886.79,1140.46) 719.54,1140.46 599.79,1260.21 v1(599.79,1464.46) 424.66,1639.59 v1(424.66,1974.41) 1286.66,1974.41 v1(1347.66,2035.41) ; v1(1309.73,2208) v1@2612.2,2208 ; v1(1462.79,3890.46) v1(1462.79,3961.46) ; v1(1725,1471.13) 2473.74,1471.13 v1(2505.36,1502.75) ; v1@1861,927 2521,927 v1(2536,912) ; v1@1995.79,2410 v1(1995.79,2673.77) 2444.77,2673.77 v1(2582,2811) ; v1(2673.54,2985.46) 2753,2906 3091.87,2906 v1(3269,2728.87) ; v1(2926.79,2021.27) 2926.79,2020.24 3004,1943.03 v1(3004,1942) ; v1(3438.73,2954.46) v1(3990.79,2954.46) ; v1(3555.42,2125.46) v1(4302.73,2125.46) 4701.46,2125.46 4787.46,2211.46 v1(5050.05,2211.46) ; v1(3943.79,1964.46) 3981.79,2002.46 v1(4302.79,2002.46) ; v1(4216,2954.46) 4235.46,2935 v1(4760.79,2935) ; v1(4855.79,2015.46) 4870.79,2030.46 v1(5089.79,2030.46) ; v1(4908.79,2780.46) 5592.47,2780.46 v1(5611.47,2761.46) v1(6365.79,2761.46) v1(7115.16,2761.46) 7205.46,2761.46 7252,2808 7814.25,2808 v1(7863.79,2758.46) v1(8609.47,2758.46) ; v1(5387.79,1950.46) 5748.47,1950.46 v1(5798.47,2000.46) v1(6544.73,2000.46) 6664.79,1880.4 v1(6664.79,1823.46) ; v1(5797.42,4186.83) v1(5797.42,4249.53) ; v1(7502.79,1788.46) 7501.69,1789.56 7501.69,1793.5 v1(7294.73,2000.46) v1(8041.1,2000.46) ; v1(8415.3,2000.46) v1(8788.73,2000.46) ; v1(8609.47,2955.46) v1(9183.79,2955.46) v1(9359.42,2955.46) ; v1(8788.73,2213.46) v1(9356.79,2213.46) v1(9638.42,2213.46) ; v1@9141.02,2000.46 v1(9536.79,2000.46) v1(9536.79,1658.46) ; v1@9183.73,3113.57 v1(9183.73,3438.46) v1(9183.73,3497.87)
  Bottom Layer w8: J34.1@363.73,3821.75 363.73,3885.4 370.21,3891.88 1111.36,3891.88 ; J39.1@1111.36,3822.75 1111.36,3891.88 ; J17.1@1466.79,4569.75 1466.79,4695.46 1506.33,4735 2179.25,4735 ; 1850.05,3891.88 1111.36,3891.88 ; J20.1@1861.05,3819.75 1861.05,3880.88 1849.2,3892.73 2599.2,3892.73 2609.05,3882.88 ; J22.1@2214.36,4569.75 2214.36,4699.88 2179.25,4735 ; J25.1@2609.05,3821.75 2609.05,3882.88 ; J27.1@2963.79,4570.75 2963.79,4693.44 2922.23,4735 ; v1(3026.73,3891.46) 2617.62,3891.46 2609.05,3882.88 ; v1(3357,3924) 3357.37,3923.63 3357.37,3822.12 J30.1@3357.73,3821.75 ; v1@3357.73,3923.27 3389.27,3891.73 4097.88,3891.73 4106.73,3882.88 J35.1@4106.73,3821.75 ; J32.1@3710.79,4571.75 3710.79,4685.15 3660.94,4735 ; 4416.12,4734.12 4458.79,4691.44 J37.1@4458.79,4568.75 ; v1(4797.58,3891.73) 4845.25,3891.73 4854.1,3882.88 J40.1@4854.1,3821.75 ; v1(5017.79,3891.46) 5017.79,3913.79 5078,3974 5625,3974 ; J18.1@5206.73,4571.75 5206.73,4694.44 5166.18,4735 ; J125.1@5598,1597 5598.73,1597.73 5598.73,1658.27 5572.54,1684.46 5496.58,1684.46 5424,1757.03 5424,1865 5469.46,1910.46 5708.47,1910.46 v1(5798.47,2000.46) 5798.47,2062.69 J137.1@5796.79,2064.38 ; 5600.05,3882.88 5600.05,3949.05 5625,3974 ; v1(5797.42,4186.83) 6010.25,3974 ; 5914.93,4733.93 5955.42,4693.44 J23.1@5955.42,4570.75 ; J26.1@6348.73,3822.75 6348.73,3883.88 6258.62,3974 ; J28.1@6700.79,4567.75 6700.79,4690.44 6656.23,4735 ; J31.1@7098.42,3822.75 7098.42,3931.83 7056.25,3974 6258.62,3974 ; J33.1@7450.79,4571.46 7450.79,4694.15 7410,4734.94 7410,4735 ; J38.1@8197.05,4571.46 8197.05,4694.15 8174.76,4716.44 8174.56,4716.44 8156,4735 ; J19.1@8949.42,4568.75 8949.42,4691.44 8905.86,4735 ; J24.1@9694.1,4571.46 9694.1,4694.15 9653.26,4735 ; J29.1@10442.42,4571.75 10442.42,4694.44 10401.86,4735 9653.26,4735 ; 2179.25,4735 2922.23,4735 ; 2922.23,4735 3660.94,4735 ; 3660.94,4735 5166.18,4735 ; 5166.18,4735 6656.23,4735 ; 5625,3974 6010.25,3974 ; 6010.25,3974 6258.62,3974 ; 6656.23,4735 7410,4735 ; 7410,4735 8156,4735 ; 8156,4735 8905.86,4735 ; 8905.86,4735 9653.26,4735
  Bottom Layer w10: J83.1@205.73,3562.01 205.73,3712.75 231.73,3738.75 355.73,3738.75 363.73,3746.75 J34.1@363.73,3821.75 ; J132.1@206.42,551.01 206.42,688.09 246.08,727.75 356.42,727.75 364.42,735.75 J130.1@364.42,810.75 365.29,811.62 365.29,874.96 417.33,927 v1@659,927 ; J96.1@304.36,2814.01 304.36,2915.36 379.75,2990.75 425.75,2990.75 445.36,3010.36 J5.1@445.36,3073.75 ; v1@424.79,1974.46 403.05,1996.2 403.05,2184.05 433,2214 497,2214 542.05,2259.05 J16.1@542.05,2325.75 ; J141.1@599.73,1317.01 v1@599.73,1467.75 ; v1(599.79,1464.46) 686.46,1464.46 737,1515 J55.1@737,1578.15 ; v1(886.79,1140.46) 886.79,1138.9 892,1133.69 v1(892,927) 1057.25,927 1111.36,872.88 1111.36,735.75 1103.36,727.75 979.36,727.75 953.36,701.75 J94.1@953.36,551.01 ; J88.1@953.36,3563.01 953.36,3713.75 979.36,3739.75 1103.36,3739.75 1111.36,3747.75 J39.1@1111.36,3822.75 ; J101.1@1130.42,2814.01 v1(1130.42,2951) 1207,2951 1268.42,3012.42 J8.1@1268.42,3073.75 ; J133.1@1307.1,2063.38 1307.1,2045.07 J133.1@1327.1,2025.07 ; J133.1@1309.73,2066.01 v1(1309.73,2208) 1309.73,2210.4 1340.79,2241.46 1458.44,2241.46 1465.73,2248.75 J42.1@1465.73,2325.75 ; v1(1462.79,3961.46) 1462.79,4043.21 1306.16,4199.84 J45.1@1306.16,4307.38 1306.16,4441.16 1351.75,4486.75 1458.79,4486.75 1466.79,4494.75 J17.1@1466.79,4569.75 ; v1(1685,926) 1685,1177.67 1719.79,1212.46 J144.1@1719.79,1313.75 ; J99.1@1699.79,547.38 1699.79,698.12 1728.42,726.75 1852.42,726.75 1860.42,734.75 v1@1860.42,926 ; J52.1@1703.05,3560.01 1703.05,3710.75 1729.05,3736.75 1853.05,3736.75 1861.05,3744.75 J20.1@1861.05,3819.75 ; J144.1@1723.42,1317.01 1725,1318.59 v1@1725,1474 ; v1(1725,1471.13) 1818.01,1471.13 1859.42,1512.54 J60.1@1859.42,1576.75 ; v1(1995.79,2673.77) 1897.42,2772.14 1897.42,2791.38 J106.1@1877.42,2811.38 1877.42,2925.14 v1(1903.28,2951) 1959,2951 2016.05,3008.05 J11.1@2016.05,3073.75 ; v1(1996,2410) 2192,2410 2215.05,2386.95 J48.1@2215.05,2325.75 2215.05,2266.09 2178.96,2230 2079.05,2230 v1(2057.05,2208) J136.1@2057.05,2066.01 ; J57.1@2053.73,4307.38 2053.73,4425.73 2106,4478 2185,4478 2214.36,4507.36 J22.1@2214.36,4569.75 ; J66.1@2448.42,3559.38 2448.42,3683.42 2490,3725 2587.3,3725 2609.05,3746.75 J25.1@2609.05,3821.75 ; J104.1@2458.13,557.09 J104.1@2448.42,547.38 2448.42,698.12 2477.05,726.75 2601.05,726.75 2609.05,734.75 J72.1@2609.05,809.75 2609.05,878.2 2575.25,912 v1(2536,912) ; J147.1@2468.73,1315.38 2468.73,1300.46 J147.1@2488.73,1280.46 ; J147.1@2471.36,1318.01 2471.36,1468.75 v1(2505.36,1502.75) 2590.75,1502.75 2607.36,1519.36 J65.1@2607.36,1577.75 ; v1(2582,2811) 2624.72,2811 J110.1@2625.1,2811.38 2625.1,2962.14 ; v1(2612.66,2208.46) 2758.54,2208.46 2804.79,2162.21 ; 2627.73,2964.75 2649.67,2986.68 2659.67,2986.68 2659.8,2986.56 v1@2676.44,2986.56 ; v1@2677.54,2985.46 2738.55,2985.46 2766.73,3013.64 J14.1@2766.73,3073.75 ; J76.1@2805.79,4311.01 2805.79,4461.75 2831.79,4487.75 2955.79,4487.75 2963.79,4495.75 J27.1@2963.79,4570.75 ; v1(2926.79,2021.27) 2925.98,2021.27 2884.87,2062.38 J139.1@2804.79,2062.38 2804.79,2162.21 ; J53.1@2961.42,2324.75 2961.42,2246.42 2922,2207 2849.58,2207 2804.79,2162.21 ; v1(3004,1942) 3004,1692.47 3217.73,1478.73 ; J79.1@3199.73,3562.01 3199.73,3712.75 3225.73,3738.75 3349.73,3738.75 3357.73,3746.75 J30.1@3357.73,3821.75 ; J115.1@3217.73,1319.01 3217.73,1478.73 ; v1(3269,2728.87) 3307.87,2728.87 3351.07,2772.07 J92.1@3373.73,2794.7 ; J113.1@3355.73,1578.75 3355,1578.02 3355,1519 3336,1500 3239,1500 3217.73,1478.73 ; J92.1@3371.1,2810.38 3371.1,2886.83 v1(3438.73,2954.46) 3466.46,2954.46 3510.84,2998.84 3510.84,3070.86 J2.1@3512.73,3072.75 ; J81.1@3552.79,4312.01 3552.79,4462.75 3578.79,4488.75 3702.79,4488.75 3710.79,4496.75 J32.1@3710.79,4571.75 ; J142.1@3555.42,2066.01 3555.42,2223.46 3575.42,2243.46 3693.46,2243.46 3709.42,2259.42 J58.1@3709.42,2325.75 ; v1(3943.79,1964.46) 3924,1944.67 3924,1734 3971.54,1686.46 4077.96,1686.46 4103.73,1660.68 J117.1@4103.73,1579.75 ; J84.1@3948.73,3562.01 3948.73,3712.75 3974.73,3738.75 4098.73,3738.75 4106.73,3746.75 J35.1@4106.73,3821.75 ; J119.1@3965.73,1320.01 3965.73,1470.75 3991.73,1496.75 4087.75,1496.75 4105,1514 4105,1556 J117.1@4106,1557 ; v1(3990.79,2954.46) 4092.54,2954.46 4123.73,2923.27 ; J97.1@4123.73,2815.01 4123.73,2923.27 ; v1(4216,2954.46) 4154.93,2954.46 4123.73,2923.27 ; v1@4216,2954.63 4280.27,3018.9 4280.27,3073.29 J6.1@4281.73,3074.75 ; J86.1@4300.79,4309.01 4300.79,4459.75 4326.79,4485.75 4450.79,4485.75 4458.79,4493.75 J37.1@4458.79,4568.75 ; v1(4302.79,2002.46) 4302.73,2002.51 v1(4302.73,2125.46) 4302.73,2223.46 4323.03,2243.75 4452.73,2243.75 4460.73,2251.75 J63.1@4460.73,2326.75 ; J89.1@4696.1,3562.01 4696.1,3712.75 4722.1,3738.75 4846.1,3738.75 4854.1,3746.75 J40.1@4854.1,3821.75 ; J123.1@4713.05,1319.01 4713.05,1469.75 4739.05,1495.75 4817,1495.75 ; v1(4760.79,2935) 4831,2935 4869.79,2896.21 ; 4817,1496 4835,1496 4852.05,1513.05 J121.1@4852.05,1578.75 ; J121.1@4851,1586 4851,1641 4834,1658 4736.25,1658 4686,1708.25 4686,1845.67 v1(4855.79,2015.46) ; J102.1@4869.79,2831.46 4869.79,2896.21 ; J9.1@5008.42,3073.75 5008.42,2985.46 4974.96,2952 4925.58,2952 4869.79,2896.21 ; J134.1@5047.42,2063.38 J134.1@5047.42,2050.46 ; J46.1@5048.73,4312.01 5048.73,4462.75 5074.73,4488.75 5198.73,4488.75 5206.73,4496.75 J18.1@5206.73,4571.75 ; J134.1@5050.05,2066.01 v1(5050.05,2211.46) 5168.76,2211.46 5208.05,2250.75 J43.1@5208.05,2325.75 ; v1(5089.79,2030.46) 5067.42,2030.46 J134.1@5047.42,2050.46 ; v1(5387.79,1950.46) 5344.79,1993.46 5059.79,1993.46 5047.42,2005.83 J134.1@5047.42,2050.46 ; J56.1@5442.05,3562.01 5442.05,3712.75 5468.05,3738.75 5592.05,3738.75 5600.05,3746.75 J21.1@5600.05,3821.75 5600.05,3882.88 ; J128.1@5458.1,1316.38 5458.1,1382.1 5598.08,1522.08 5598.08,1578.1 J125.1@5598.73,1578.75 ; v1(5611.47,2761.46) J107.1@5611.47,2808.06 ; J107.1@5611.79,2808.38 5611.79,2941.79 5650,2980 5731,2980 5757.42,3006.42 J12.1@5757.42,3070.75 ; J137.1@5796.79,2064.38 5796.79,2161.79 5878.75,2243.75 5948.56,2243.75 5954.42,2249.61 J49.1@5954.42,2326.75 ; v1(5797.42,4249.53) 5797.42,4461.75 5823.42,4487.75 5947.42,4487.75 5955.42,4495.75 J23.1@5955.42,4570.75 ; J67.1@6190.73,3563.01 6190.73,3713.75 6216.73,3739.75 6340.73,3739.75 6348.73,3747.75 J26.1@6348.73,3822.75 ; J131.1@6210.05,1319.01 6210.05,1416.05 6289.75,1495.75 6333.75,1495.75 6349,1511 6349,1659.67 6414.79,1725.46 6617.79,1725.46 6664.79,1772.46 v1(6664.79,1823.46) ; J111.1@6368.73,2814.01 6368.73,2941.73 6400,2973 6471,2973 6504.73,3006.73 J15.1@6504.73,3073.75 ; J77.1@6542.79,4308.01 6542.79,4458.75 6568.79,4484.75 6692.79,4484.75 6700.79,4492.75 J28.1@6700.79,4567.75 ; J54.1@6702.36,2326.75 6701.66,2326.04 6701.66,2270.14 6663.52,2232 6580,2232 6544.73,2196.73 J140.1@6544.73,2064.38 v1(6544.73,2000.46) v1(7294.73,2000.46) 7294.73,2062.38 J143.1@7292.73,2064.38 ; J80.1@6937.79,3560.38 6938.79,3559.38 6938.79,3484.46 6984.79,3438.46 7711.79,3438.46 ; J80.1@6940.42,3563.01 6940.42,3713.75 6966.42,3739.75 7090.42,3739.75 7098.42,3747.75 J31.1@7098.42,3822.75 ; 6959.73,1244.51 6959.73,1387.73 7095.08,1523.08 7095.08,1561.01 J114.1@7095.54,1561.46 ; v1@7115.1,2761.46 J93.1@7115.1,2816.19 ; J93.1@7116.79,2814.01 7116.79,2867 7251.61,3001.82 7251.61,3072.57 J3.1@7252.79,3073.75 ; 7124.79,955.46 7176.79,903.46 7421.38,903.46 7451.1,873.74 J74.1@7451.1,810.75 7451.1,735.77 7364.47,649.14 J109.1@7364.47,548.38 ; J82.1@7292.79,4312.01 7292.79,4462.75 7318.79,4488.75 7442.79,4488.75 7450.79,4496.75 J33.1@7450.79,4571.75 ; J143.1@7295.36,2067.01 7295.36,2172.36 7355,2232 7428,2232 7450.36,2254.36 J59.1@7450.36,2326.75 ; v1@7502.79,1785.46 7560.79,1727.46 7827.79,1727.46 7862.1,1693.14 ; J85.1@7685.1,3560.38 7685.1,3465.14 7711.79,3438.46 ; J85.1@7687.73,3563.01 7687.73,3703.73 7723.75,3739.75 7837.73,3739.75 7845.73,3747.75 J36.1@7845.73,3822.75 ; J120.1@7704.1,1319.01 7704.1,1440.1 7759.75,1495.75 7804,1495.75 ; 7804,1496 7821,1496 7843.1,1518.1 J118.1@7843.1,1578.75 ; v1(7863.79,2758.46) J98.1@7863.79,2813.01 ; J98.1@7864.79,2813.01 7864.79,2874.79 8000.79,3010.79 J7.1@8000.79,3072.75 ; J95.1@8019.42,548.38 8019.42,689.09 8066.79,736.46 8185.75,736.46 8199.16,749.87 8199.16,807.86 J69.1@8201.05,809.75 ; J87.1@8039.05,4312.01 8039.05,4462.75 8065.05,4488.75 8189.05,4488.75 8197.05,4496.75 J38.1@8197.05,4571.75 ; J146.1@8040.42,2063.38 8040.42,2200.42 8070,2230 8170,2230 8199.05,2259.05 J64.1@8199.05,2325.75 ; v1@8041.05,1996.6 J146.1@8041.05,2063.38 ; v1@8046.66,2000.46 v1(8415.3,2000.46) ; J124.1@8450.79,1315.38 8450.79,1466.12 8479.42,1494.75 8560,1494.75 ; 8560,1495 8573,1495 8590.42,1512.42 J122.1@8590.42,1577.75 ; J41.1@8591.73,3821.75 8591.73,3744.61 8585.88,3738.75 8502.75,3738.75 8436.73,3672.73 8436.73,3459.51 8457.79,3438.46 ; v1(8609.47,2758.46) J103.1@8609.47,2811.38 v1(8609.47,2955.46) 8688.32,2955.46 8749.1,3016.24 J10.1@8749.1,3073.75 ; v1(8788.73,2000.46) J135.1@8788.73,2064.38 v1(8788.73,2213.46) 8904.46,2213.46 8946.36,2255.36 J44.1@8946.36,2326.75 ; v1@8789.32,2000.46 v1(9141.66,2000.46) ; J51.1@8791.42,4309.01 8791.42,4459.75 8817.42,4485.75 8941.42,4485.75 8949.42,4493.75 J19.1@8949.42,4568.75 ; v1(9183.73,3438.46) 8457.79,3438.46 ; v1(9183.73,3497.87) 9183.73,3712.75 9209.73,3738.75 9331.88,3738.75 9337.73,3744.61 J1.1@9337.73,3821.75 ; v1(9183.79,2955.46) v1(9183.79,3116.46) ; J105.1@9245.79,550.46 9245.79,698.12 9274.42,726.75 9387.08,726.75 9406.42,746.09 J73.1@9406.42,809.75 J73.1@9407.1,810.43 ; v1(9356.79,2213.46) J108.1@9356.79,2811.38 ; J108.1@9359.42,2814.01 v1(9359.42,2955.46) 9447.02,2955.46 9497.42,3005.86 J13.1@9497.42,3073.75 ; J62.1@9536.1,4313.01 9536.1,4463.75 9562.1,4489.75 9686.1,4489.75 9694.1,4497.75 J24.1@9694.1,4572.75 ; v1(9536.79,1658.46) 9893.79,1658.46 9912.36,1639.88 9912.36,1502.75 9904.36,1494.75 9780.36,1494.75 9751.73,1466.12 J127.1@9751.73,1315.38 ; v1(9536.79,2000.46) J138.1@9536.79,2063.38 ; v1(9638.42,2213.46) 9638.57,2213.61 9662.61,2213.61 9697.42,2248.42 J50.1@9697.42,2325.75 ; J100.1@9901.79,550.83 9901.79,698.49 9930.42,727.12 10054.42,727.12 10062.42,735.12 J71.1@10062.42,810.12 ; J78.1@10284.42,4312.01 10284.42,4462.75 10310.42,4488.75 10434.42,4488.75 10442.42,4496.75 J29.1@10442.42,4571.75 ; 7711.79,3438.46 8457.79,3438.46
  other v1: 659,926
pads on no net: J47.66 J47.67 J47.68 J47.69 J47.70 J47.71 J47.72 J47.73 J47.74 J47.75 J47.76 J47.77 J47.78 J47.79 J47.80 J75.22 J75.23

## Other copper
Bottom Layer:
  rectangle net I2C1.SCL_2: 2324,4317 2384,4429
  rectangle net GND: 7546.79,748.46 7579.79,860.46
  rectangle net VDD: 1281.79,2013.46 1365.79,2077.46
  rectangle net VDD: 4842.79,2761.46 4923.79,2859.46
  rectangle net OLED_RST#: 3746,2767 3825,2856
  rectangle net OLED_RST#: 2809.79,1265.46 2893.79,1361.46
  rectangle net I2C_4.SDA_41: 1481.79,2012.28 1548.62,2106.46
  rectangle net I2C_4.SDA_55: 2643.79,1266.46 2715.79,1361.46
  rectangle net I2C_4.SDA_46: 5218.79,2016.46 5284.79,2111.46
  rectangle net I2C_4.SDA_51: 8932.79,2019.46 9013.79,2109.46

## Silkscreen, mask and mechanical layers (free items; w line width, h text height)
Bottom Overlay:
  text "OLED_12" at 9813.1,4664.75 h35
  text "OLED_4" at 3829.79,4663.75 h35
  text "OLED_6" at 5325.73,4663.75 h35
  text "OLED_9" at 7569.79,4663.75 h35
  text "OLED_10" at 8316.05,4663.46 h35
  text "OLED_13" at 10561.42,4663.75 h35
  text "OLED_3" at 3082.79,4662.75 h35
  text "OLED_7" at 6074.42,4662.75 h35
  text "OLED_1" at 1585.79,4661.75 h35
  text "OLED_2" at 2333.36,4661.75 h35
  text "OLED_5" at 4577.79,4660.75 h35
  text "OLED_11" at 9068.42,4660.75 h35
  text "OLED_8" at 6819.79,4659.75 h35
  text "OLED_15" at 1233.36,3914.75 h35
  text "OLED_22" at 6469.73,3914.75 h35
  text "OLED_23" at 7219.42,3914.75 h35
  text "OLED_24" at 7966.73,3914.75 h35
  text "OLED_14" at 485.77,3913.75 h35
  text "OLED_17" at 2730.05,3913.75 h35
  text "OLED_18" at 3478.73,3913.75 h35
  text "OLED_19" at 4227.73,3913.75 h35
  text "OLED_20" at 4975.1,3913.75 h35
  text "OLED_21" at 5720.05,3913.75 h35
  text "OLED_25" at 8715.73,3913.75 h35
  text "OLED_26" at 9462.73,3913.75 h35
  text "OLED_16" at 1983.05,3911.75 h35
  text "OLED_32" at 4402.73,3166.75 h35
  text "OLED_27" at 583.36,3165.75 h35
  text "OLED_28" at 1410.42,3165.75 h35
  text "OLED_29" at 2159.05,3165.75 h35
  text "OLED_30" at 2906.73,3165.75 h35
  text "OLED_33" at 5151.42,3165.75 h35
  text "OLED_35" at 6647.73,3165.75 h35
  text "OLED_36" at 7395.79,3165.75 h35
  text "OLED_38" at 8891.1,3165.75 h35
  text "OLED_39" at 9638.42,3165.75 h35
  text "OLED_31" at 3651.73,3164.75 h35
  text "OLED_37" at 8143.79,3164.75 h35
  text "OLED_34" at 5893.42,3162.75 h35
  text "OLED_45" at 4582.73,2418.75 h35
  text "OLED_47" at 6078.42,2418.75 h35
  text "OLED_48" at 6826.36,2418.75 h35
  text "OLED_49" at 7574.36,2418.75 h35
  text "OLED_51" at 9069.36,2418.75 h35
  text "OLED_40" at 682.05,2417.75 h35
  text "OLED_41" at 1587.73,2417.75 h35
  text "OLED_42" at 2336.05,2417.75 h35
  text "OLED_44" at 3834.42,2417.75 h35
  text "OLED_46" at 5329.05,2417.75 h35
  text "OLED_50" at 8322.05,2417.75 h35
  text "OLED_52" at 9818.42,2417.75 h35
  text "OLED_43" at 3087.42,2416.75 h35
  text "OLED_57" at 4244.73,1671.75 h35
  text "OLED_61" at 7237.73,1671.75 h35
  text "OLED_56" at 3496.73,1670.75 h35
  text "OLED_58" at 4992.05,1670.75 h35
  text "OLED_59" at 5739.73,1670.75 h35
  text "OLED_60" at 6489.05,1670.75 h35
  text "OLED_62" at 7983.1,1670.75 h35
  text "OLED_55" at 2750.36,1669.75 h35
  text "OLED_63" at 8732.42,1669.75 h35
  text "OLED_53" at 878.73,1668.75 h35
  text "OLED_54" at 2002.42,1668.75 h35
  text "OLED_64" at 10033.36,1663.32 h35
  text "OLED_65" at 485.86,903.19 h35
  text "OLED_66" at 1232.36,902.75 h35
  text "OLED_69" at 7572.1,902.75 h35
  text "OLED_72" at 9528.1,902.43 h35
  text "OLED_67" at 1981.42,901.75 h35
  text "OLED_68" at 2730.05,901.75 h35
  text "OLED_70" at 8322.05,901.75 h35
  text "OLED_71" at 10182.79,901.75 h35
  text "I2C_LINES" at 7255.79,317.46 h70
Mechanical 2 (Mech3):
  drawing of 901 lines, arcs and shapes, not listed